# Altium PCB PCB1.PcbDoc
Units mm, origin at the board's own origin, x right, y up, seen from the top; angles counter-clockwise.
Board outline 49.5 x 70.5 mm, 2 copper layers (Top Layer, Bottom Layer); 21 components, 17 nets, 64 pads, 0 vias.
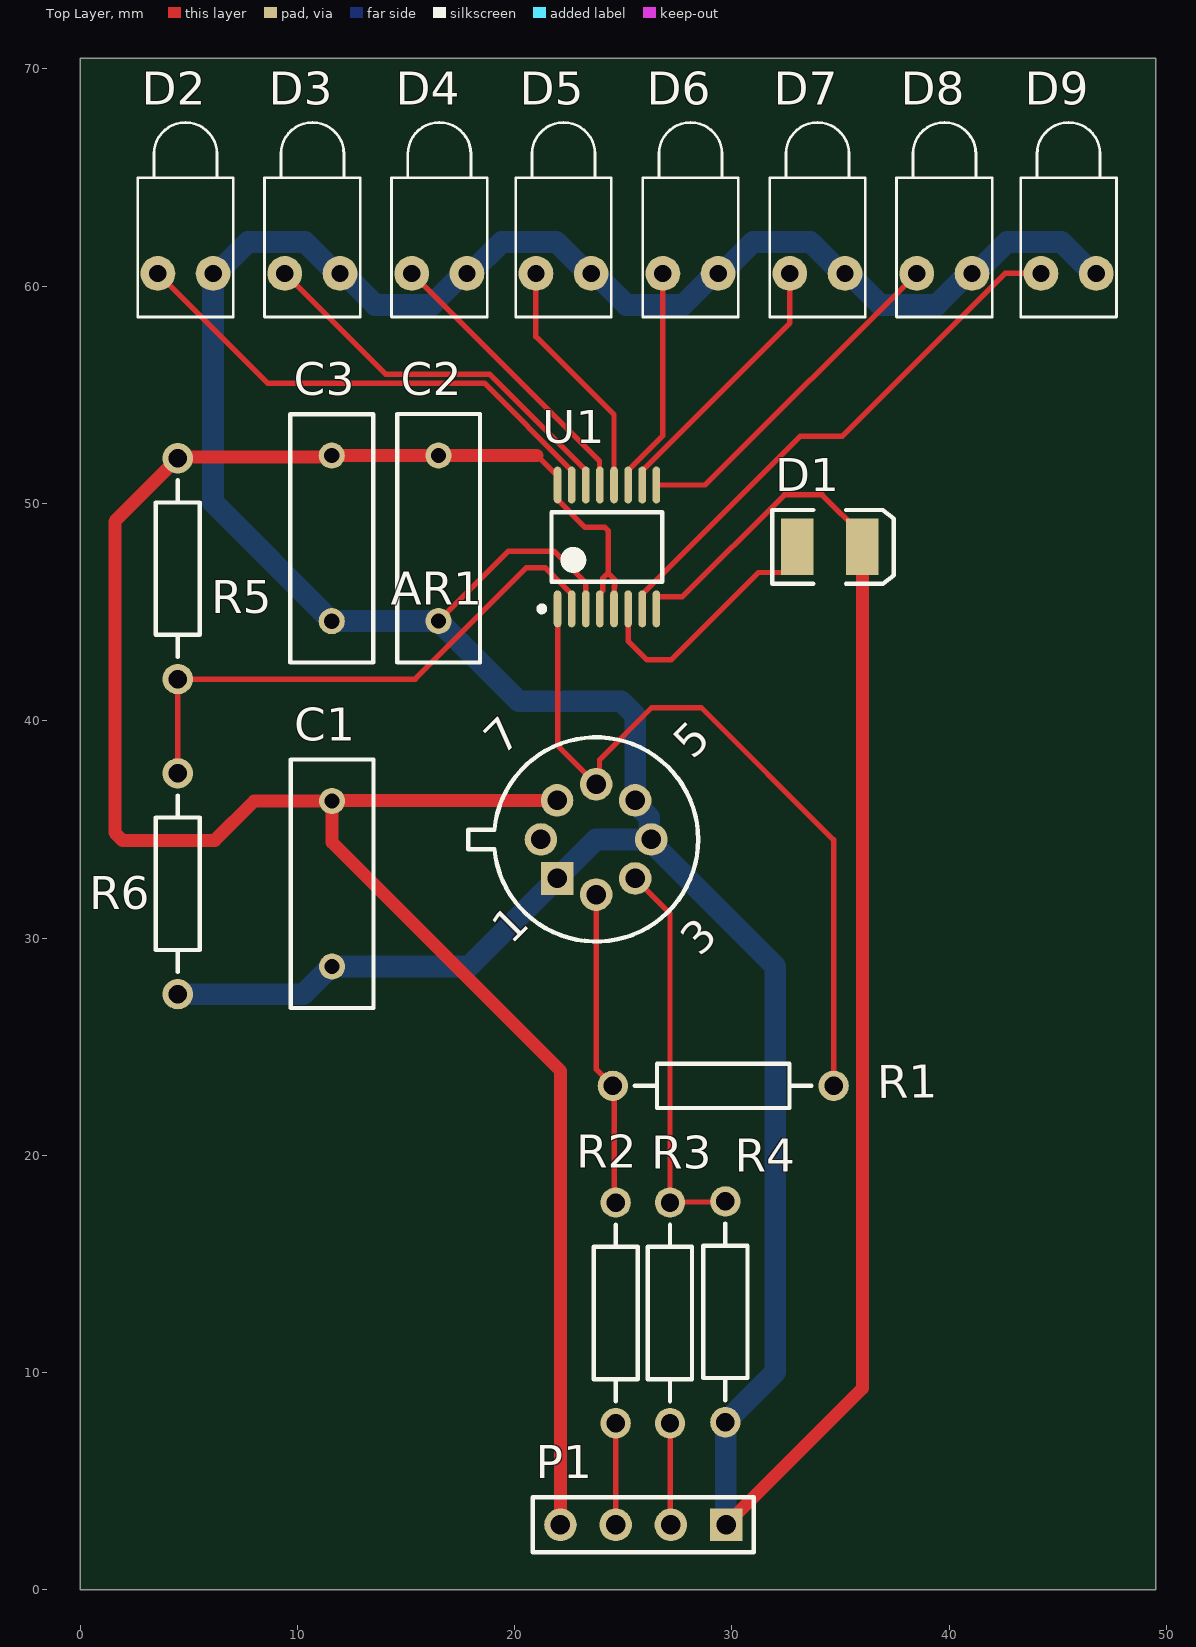
[diagram p0: Top Layer view]
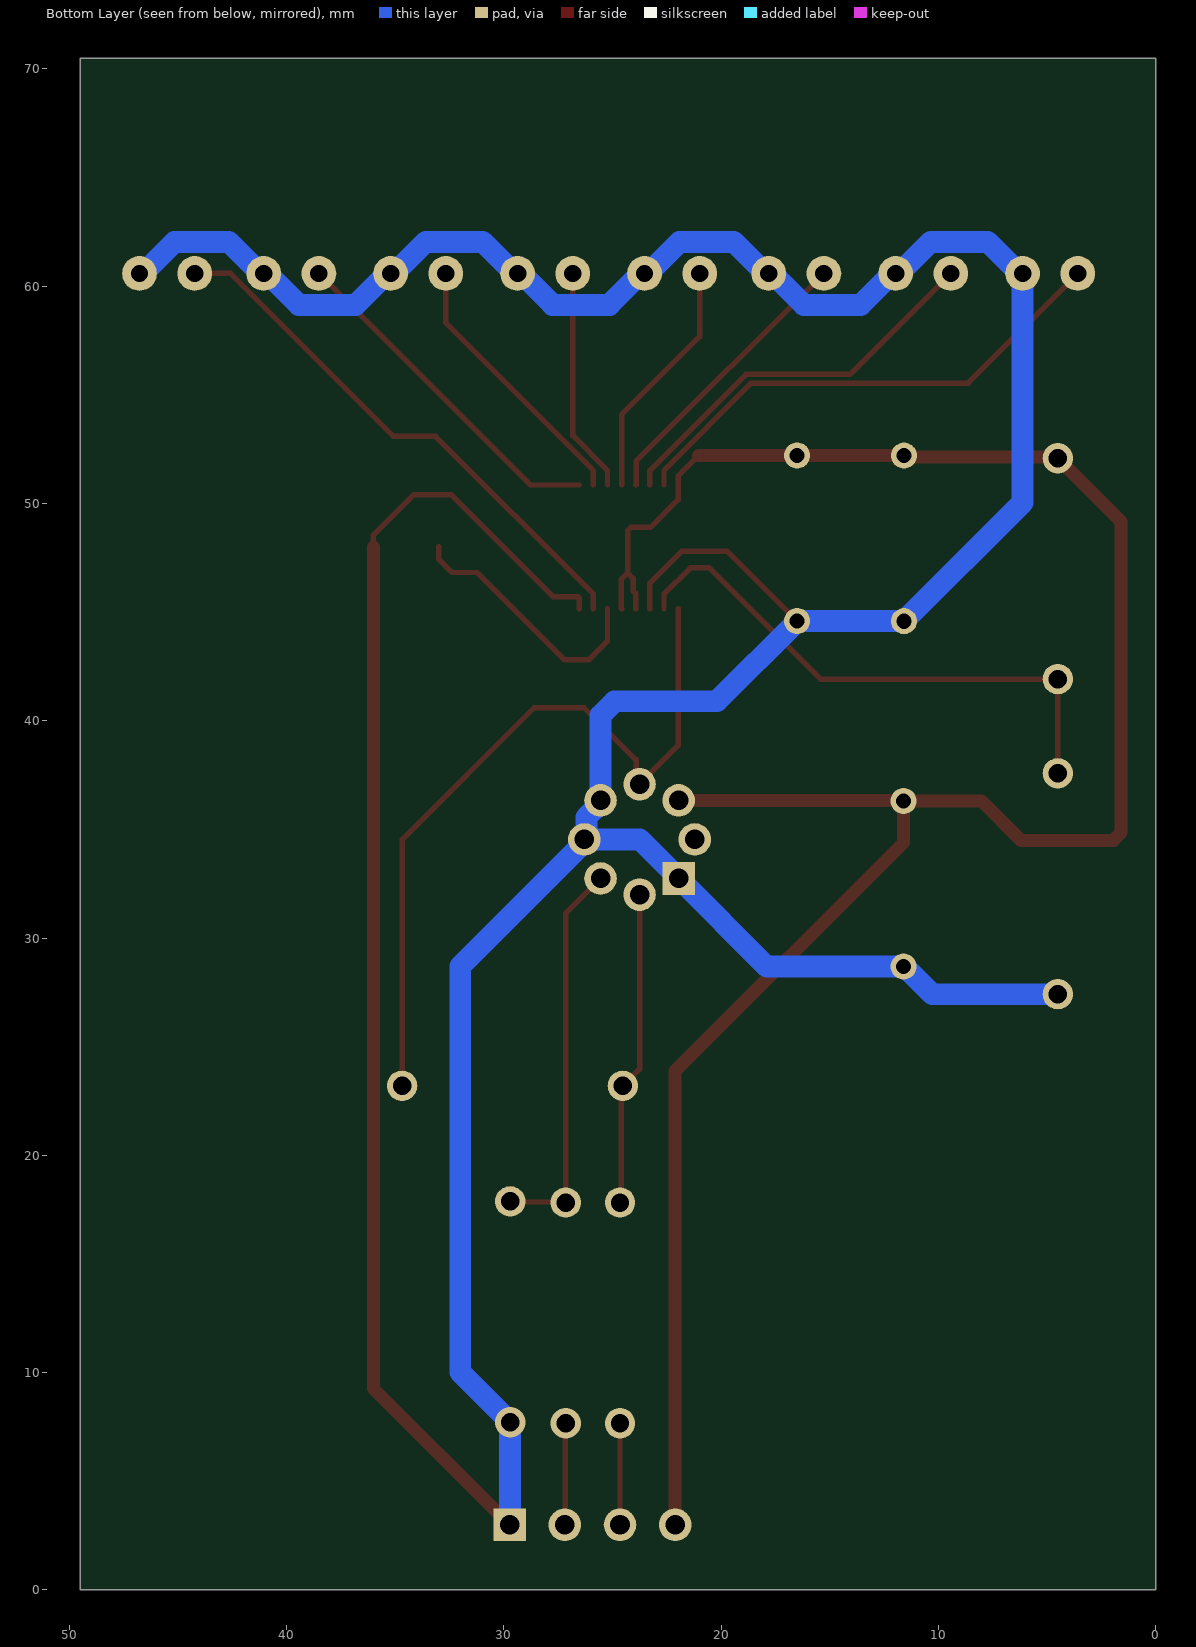
[diagram p1: Bottom Layer view, seen from below]

## Layer stack, top to bottom
Top Solder: solder mask 0.0102, Solder Resist, Dk 3.5
Top Layer: signal copper 0.0356
Dielectric 1: dielectric 0.32, FR-4, Dk 4.8
Bottom Layer: signal copper 0.0356
Bottom Solder: solder mask 0.0102, Solder Resist, Dk 3.5

## Board outline
0,0 0,70.5 49.5,70.5 49.5,0

## Design rules (kind name [scope] priority, off if disabled: settings)
Clearance [All] p1: gap=0.15 ignorepadtopadclearanceinfootprint=FALSE
PolygonConnect [All] p1: connectstyle=Relief reliefconductorwidth=0.254 reliefentries=4 polygonreliefangle="90 Angle" airgapwidth=0.254
RoutingVias [All] p1: holewidth=0.711 width=1.27 viastyle="Through Hole" minholewidth=0.711 minwidth=1.27 maxholewidth=0.711 maxwidth=1.27
SolderMaskExpansion [All] p1: expansion=0.102 istentingtop=FALSE
SupplyNets "Schematic Supply Nets_1" [InNet('VCC5P0')] p1: voltage=0.000
SupplyNets "Schematic Supply Nets" [InNet('GND')] p2: voltage=0.000
Width [All] p1: maxlimit=3 minlimit=0.15 preferedwidth=0.254
30 further rules are at their usual default settings.

## Components (designator, comment, footprint, x,y, rotation, side; value= is the part's Value field where it differs from the comment)
AR1 "Op Amp" H-08A 23.75,34.54 r45 top
C1 "Cap" RAD-0.3 11.6,32.5 r270 top value=100nF
C2 "Cap" RAD-0.3 16.5,48.4 r90 top value=100pF
C3 "Cap" RAD-0.3 11.584,48.394 r90 top value=100nF
D1 "LED3" 3.5X2.8X1.9 34.5,48 r0 top
D2 "LED1" LED-1 4.853,60.586 r90 top
D3 "LED1" LED-1 10.695,60.586 r90 top
D4 "LED1" LED-1 16.537,60.586 r90 top
D5 "LED1" LED-1 22.252,60.586 r90 top
D6 "LED1" LED-1 28.094,60.586 r90 top
D7 "LED1" LED-1 33.936,60.586 r90 top
D8 "LED1" LED-1 39.778,60.586 r90 top
D9 "LED1" LED-1 45.493,60.586 r90 top
P1 "Header 4" HDR1X4 29.73,3 r180 top
R1 "Res2" AXIAL-0.4 29.6,23.2 r0 top value=10K
R2 "Res2" AXIAL-0.4 24.65,12.75 r90 top value=10K
R3 "Res2" AXIAL-0.4 27.15,12.75 r90 top value=10K
R4 "Res2" AXIAL-0.4 29.7,12.8 r270 top value=10K
R5 "Res2" AXIAL-0.4 4.5,47 r90 top value=10K
R6 "Res2" AXIAL-0.4 4.5,32.5 r90 top value=10K
U1 "ADC-8" SOT403-1_N 24.25,48 r90 top

## Footprints (in the part's own frame and the unit in brackets; to place one, negate y for a bottom-side part, rotate by r counter-clockwise, add the part's x,y. Pads: shape width x height; smd on the part's side, far side on the other; paste and mask are expansions set on the pad)
3.5X2.8X1.9 [mm] "SM LED; 2 C-Bend Leads; Body 3.5 x 2.8 x 1.9 mm, inc leads (LxWxH typ)"
  rect 1.5x2.6 smd: 1(-1.5,0) 2(1.5,0)
  silkscreen extent -2.65,-1.7 2.95,1.7
AXIAL-0.4 [mm] "Axial Device, Thru-Hole; 2 Leads; 0.4 in Pin Spacing"
  round 1.4 hole 0.85: 1(-5.08,0) 2(5.08,0)
  silkscreen extent -4.06,-1.02 4.06,1.02
H-08A [mm] "Can; 8 Leads; Pin Circle Dia. 5.08 mm; Lead Dia. 0.53 mm (max)"
  rect 1.5x1.5 hole 0.9 rot 45: 1(-2.54,0)
  round 1.5 hole 0.9: 2(-1.796,-1.796) 3(0,-2.54) 4(1.796,-1.796) 5(2.54,0) 6(1.796,1.796) 7(0,2.54) 8(-1.796,1.796)
  silkscreen extent -4.7,-4.7 4.7,4.7
HDR1X4 [mm] "Connector; Header; 4 Position"
  rect 1.5x1.5 hole 0.9: 1(0,0)
  round 1.5 hole 0.9: 2(2.54,0) 3(5.08,0) 4(7.62,0)
  silkscreen extent -1.27,-1.27 8.89,1.27
LED-1 [mm] "LED; 2 Leads"
  round 1.6 hole 0.8: 1(0,1.27) 2(0,-1.27)
  silkscreen extent -2,-2.2 6.95,2.2
RAD-0.3 [mm] "Radial Cap, Thru-Hole; 2 Leads; 0.3 in Pin Spacing"
  round 1.2 hole 0.7: 1(-3.81,0) 2(3.81,0)
  silkscreen extent -5.71,-1.91 5.71,1.91
SOT403-1_N [mm] "TSOP, 16-Leads, Body 5x4.4mm, Pitch 0.65mm, IPC Medium Density"
  oval 1.7x0.35 smd: 1(-2.85,2.275) 2(-2.85,1.625) 3(-2.85,0.975) 4(-2.85,0.325) 5(-2.85,-0.325) 6(-2.85,-0.975) 7(-2.85,-1.625) 8(-2.85,-2.275) 9(2.85,-2.275) 10(2.85,-1.625) 11(2.85,-0.975) 12(2.85,-0.325) 13(2.85,0.325) 14(2.85,0.975) 15(2.85,1.625) 16(2.85,2.275)
  silkscreen extent -2.97,-2.55 1.6,3.12, body extent -2.25,-2.55 2.25,2.55, height 1.1

## Part data
AR1: "FET Operational Amplifier", ComponentLink1Description="Manufacturer Link", ComponentLink1URL=http://www.analog.com/, DatasheetVersion="REV. B", LatestRevisionDate=17-Jul-2002, LatestRevisionNote="Re-released for DXP Platform.", PackageDescription="Can; 8 Leads; Pin Circle Dia. 5.08 mm; Lead Dia. 0.53 mm (max)", PackageReference=H-08A, PackageVersion=1990, Published=8-Jun-2000, Publisher="Altium Limited"
C1 C3: "Capacitor", LatestRevisionDate=17-Jul-2002, LatestRevisionNote="Re-released for DXP Platform.", PackageDescription="Radial Cap, Thru-Hole; 2 Leads; 0.3 in Pin Spacing", PackageReference=RAD-0.3, Published=8-Jun-2000, Publisher="Altium Limited"
C2: "Monolith Capacitors / Ceramic Capacitors-DIP CAP_D7.5X5MM_TM 100pF ±5% 2KV SL", Case/Package=Radial, Dielectric Material=Ceramic, Manufacturer=TDK, Manufacturer Lifecycle Status=PRODUCTION, Manufacturer Part Number=CC45SL3DD101JYVNA, Max Operating Temperature=125°C, Min Operating Temperature=-25°C, Supplier Part Number=810-CC45SL3DD101JYVN, Voltage Rating (DC)=2kV, Category="Ceramic Capacitors", ComponentLink1Description=https://datasheet.octopart.com:443/CC45SL3DD101JYVNA-TDK-datasheet-158279370.pdf?src-supplier=ODG+(Origin+Data+Global), ComponentLink1URL=https://datasheet.octopart.com:443/CC45SL3DD101JYVNA-TDK-datasheet-158279370.pdf?src-supplier=ODG+(Origin+Data+Global), ComponentLink2Description=https://datasheet.octopart.com:443/CC45SL3DD101JYVNA-TDK-datasheet-151651375.pdf?src-supplier=TDK, ComponentLink2URL=https://datasheet.octopart.com:443/CC45SL3DD101JYVNA-TDK-datasheet-151651375.pdf?src-supplier=TDK, ComponentLink3Description=https://datasheet.octopart.com:443/CC45SL3DD101JYVNA-TDK-datasheet-188931076.pdf?src-supplier=TME, ComponentLink3URL=https://datasheet.octopart.com:443/CC45SL3DD101JYVNA-TDK-datasheet-188931076.pdf?src-supplier=TME, Contact Plating=Tin, Export Control Classification Number (ECCN) Code=EAR99, Harmonized Tariff Schedule (HTS) Code=8532.23.00.60, Height=7.5mm, Introduction Date=2011-07-11, LatestRevisionDate=17-Jul-2002, LatestRevisionNote="Re-released for DXP Platform.", Length=7.5mm, Lifecycle Status=Production, Max Thickness=5mm, Number of Terminals=2, PackageDescription="Radial Cap, Thru-Hole; 2 Leads; 0.3 in Pin Spacing", PackageReference=RAD-0.3, Pricing="1=0.34, 10=0.148, 50=0.148, 100=0.132, 1000=0.097, 10000=0.073 (USD)", Published=8-Jun-2000, Publisher="Altium Limited", REACH SVHC=Yes, RoHS=Compliant, Schedule B=8532230060|8532230060|8532230060|8532230060|8532230060, Stock=1862, Supplier=Mouser, Terminal Pitch=5mm, Width=5mm
D1: "Typical BLUE SiC LED", DatasheetVersion=16-Apr-2002, LatestRevisionDate=17-Dec-2003, LatestRevisionNote="PCB Footprint replaced.", PackageDescription="SM LED; 2 C-Bend Leads; Body 3.5 x 2.8 x 1.9 mm, inc leads (LxWxH typ)", PackageReference=3.5X2.8X1.9, PackageVersion=16-Apr-2002, Published=8-Jun-2000, Publisher="Altium Limited"
D2 D3 D4 D5 D6 D7 D8 D9: "Typical RED GaAs LED", LatestRevisionDate=08-Jul-2005, LatestRevisionNote="Mech Layer 1 removed.", PackageDescription="LED; 2 Leads", PackageReference=LED-1, Published=8-Jun-2000, Publisher="Altium Limited"
P1: "Header, 4-Pin", LatestRevisionDate=17-Jul-2002, LatestRevisionNote="Re-released for DXP Platform.", Publisher="Altium Limited"
R1 R2 R3 R4 R5 R6: "Resistor", LatestRevisionDate=17-Jul-2002, LatestRevisionNote="Re-released for DXP Platform.", PackageDescription="Axial Device, Thru-Hole; 2 Leads; 0.4 in Pin Spacing", PackageReference=AXIAL-0.4, Published=8-Jun-2000, Publisher="Altium Limited"
U1: "Generic 8-Bit A/D Converter", Code_JEDEC=MO-153, LatestRevisionDate=29-May-2009, LatestRevisionNote="IPC-7351 Footprint Added.", PackageDescription="16-Pin Thin Small Outline Package 0.65 mm Pitch", PackageReference=SOT403-1, PackageVersion=Mar-2002, Published=8-Jun-2000, Publisher="Altium Limited"

## Nets (pads, with @x,y where several pads share a name; then routed paths per layer and width w, separated by ;. In a path a pad name is that pad's centre, name@x,y a point inside that pad or via, vN(x,y) a via of type N, cw(c..) or ccw(c..) an arc to the next point about the centre after c; other vN are vias at no path point)
D0: D9.1 U1.7 | length 25.1
  Top Layer w0.25: U1.7 25.875,45.825 33.139,53.089 35.072,53.089 42.568,60.586 D9.1
D1: D8.1 U1.9 | length 16
  Top Layer w0.25: U1.9 28.772,50.85 D8.1
D2: D7.1 U1.10 | length 12.5
  Top Layer w0.25: U1.10 25.875,51.525 32.666,58.316 D7.1
D3: D6.1 U1.11 | length 10.4
  Top Layer w0.25: U1.11 25.225,51.525 26.824,53.124 D6.1
D4: D5.1 U1.12 | length 11.2
  Top Layer w0.25: D5.1 20.982,57.683 24.575,54.09 U1.12
D5: D4.1 U1.13 | length 13.3
  Top Layer w0.25: D4.1 23.906,51.947 23.906,50.869 U1.13
D6: D3.1 U1.14 | length 18.3
  Top Layer w0.25: D3.1 14.072,55.939 18.861,55.939 23.275,51.525 U1.14
D7: D2.1 U1.15 | length 23.5
  Top Layer w0.25: D2.1 8.63,55.539 18.611,55.539 22.625,51.525 U1.15
GND: AR1.1 AR1.4 AR1.5 C1.2 C2.1 C3.1 D1.2 D2.2 D3.2 D4.2 D5.2 D6.2 D7.2 D8.2 D9.2 P1.1 R4.2 R6.1 U1.3 U1.8 | length 219.5
  Top Layer w0.25: C2.1 19.719,47.809 21.808,47.809 23.275,46.342 U1.3 ; U1.8 26.525,45.654 26.571,45.7 27.714,45.7 32.414,50.4 34.15,50.4 36,48.55 D1.2
  Top Layer w0.6: P1.1 36,9.27 D1.2
  Bottom Layer w1: R6.1 10.276,27.42 11.546,28.69 C1.2 17.9,28.69 AR1.1 23.75,34.54 AR1.4 ; P1.1 29.715,3.015 29.715,7.705 R4.2 32,10.02 32,28.7 26.29,34.41 AR1.4 ; D9.2 46.601,60.586 45.151,62.036 42.66,62.036 41.21,60.586 D8.2 40.886,60.586 39.436,59.136 36.818,59.136 35.368,60.586 D7.2 35.044,60.586 33.594,62.036 30.976,62.036 29.526,60.586 D6.2 29.202,60.586 27.752,59.136 25.134,59.136 23.684,60.586 D5.2 23.36,60.586 21.91,62.036 19.419,62.036 17.969,60.586 D4.2 17.645,60.586 16.195,59.136 13.577,59.136 12.127,60.586 D3.2 11.803,60.586 10.353,62.036 7.735,62.036 6.285,60.586 D2.2 6.123,50.045 C3.1 11.587,44.587 16.497,44.587 C2.1 20.19,40.9 24.9,40.9 25.546,40.254 AR1.5 25.546,36.201 26.194,35.552 26.194,34.636 AR1.4
INN: P1.3 R2.1 | length 4.7
  Top Layer w0.25: P1.3 R2.1
INP: P1.2 R3.1 | length 4.7
  Top Layer w0.25: R3.1 27.17,7.65 27.17,3.02 P1.2
NetAR1_2: AR1.2 R1.1 R2.2 | length 14.5
  Top Layer w0.25: AR1.2 23.75,23.97 R1.1 24.585,23.135 24.585,17.895 R2.2
NetAR1_3: AR1.3 R3.2 R4.1 | length 18.1
  Top Layer w0.25: AR1.3 27.15,31.14 R3.2 27.175,17.855 29.675,17.855 R4.1
NetD1_1: D1.1 U1.6 | length 12.1
  Top Layer w0.25: U1.6 25.225,43.675 26.1,42.8 27.2,42.8 31.225,46.825 32.375,46.825 33,47.45 D1.1
NetR5_1: R5.1 R6.2 U1.2 | length 25.8
  Top Layer w0.25: R6.2 R5.1 15.42,41.92 20.534,47.034 21.416,47.034 22.625,45.825 U1.2
OPAMP_OUT: AR1.6 R1.2 U1.1 | length 35.6
  Top Layer w0.25: U1.1 21.975,38.855 AR1.6 23.905,37.235 23.905,38.205 26.3,40.6 28.6,40.6 34.68,34.52 R1.2
VCC5P0: AR1.7 C1.1 C2.2 C3.2 P1.4 R5.2 U1.4 U1.5 U1.16 | length 104.8
  Top Layer w0.25: 21.04,52.21 21.975,51.275 U1.16 21.975,50.175 23.25,48.9 24.154,48.9 24.3,48.754 24.3,46.8 ; U1.4 23.925,45.852 24.05,45.977 24.05,46.55 24.3,46.8 ; U1.5 24.594,45.169 24.594,46.194 24.6,46.2 24.6,46.5 24.3,46.8
  Top Layer w0.6: 21.04,52.21 C2.2 16.497,52.207 11.587,52.207 C3.2 11.522,52.142 4.562,52.142 R5.2 1.6,49.18 1.6,34.851 1.951,34.5 6.2,34.5 8.01,36.31 C1.1 ; AR1.7 21.941,36.323 11.613,36.323 C1.1 ; P1.4 22.11,23.89 11.6,34.4 C1.1
pads on no net: AR1.8

## Silkscreen, mask and mechanical layers (free items; w line width, h text height)
Mechanical 1:
  the board outline again, w0.15

## Dimensions
0,0 to 0,70.5 on Mechanical 1
0,70.5 to 49.5,70.5 on Mechanical 1

## Text inside footprints (layer, text, board x,y; h text height)
AR1: Top Overlay "1" at 19.844,29.65 h1.5 r45; Top Overlay "3" at 28.524,29.103 h1.5 r45; Top Overlay "5" at 28.205,38.163 h1.5 r45; Top Overlay "7" at 19.485,38.336 h1.5 r45